# Altium PCB Kindle_TX.PcbDoc
Units mm, origin at the board's own origin, x right, y up, seen from the top; angles counter-clockwise.
Board outline 26 x 44 mm, 2 copper layers (Top Layer, Bottom Layer); 2 components, 2 nets, 20 pads, 0 vias.
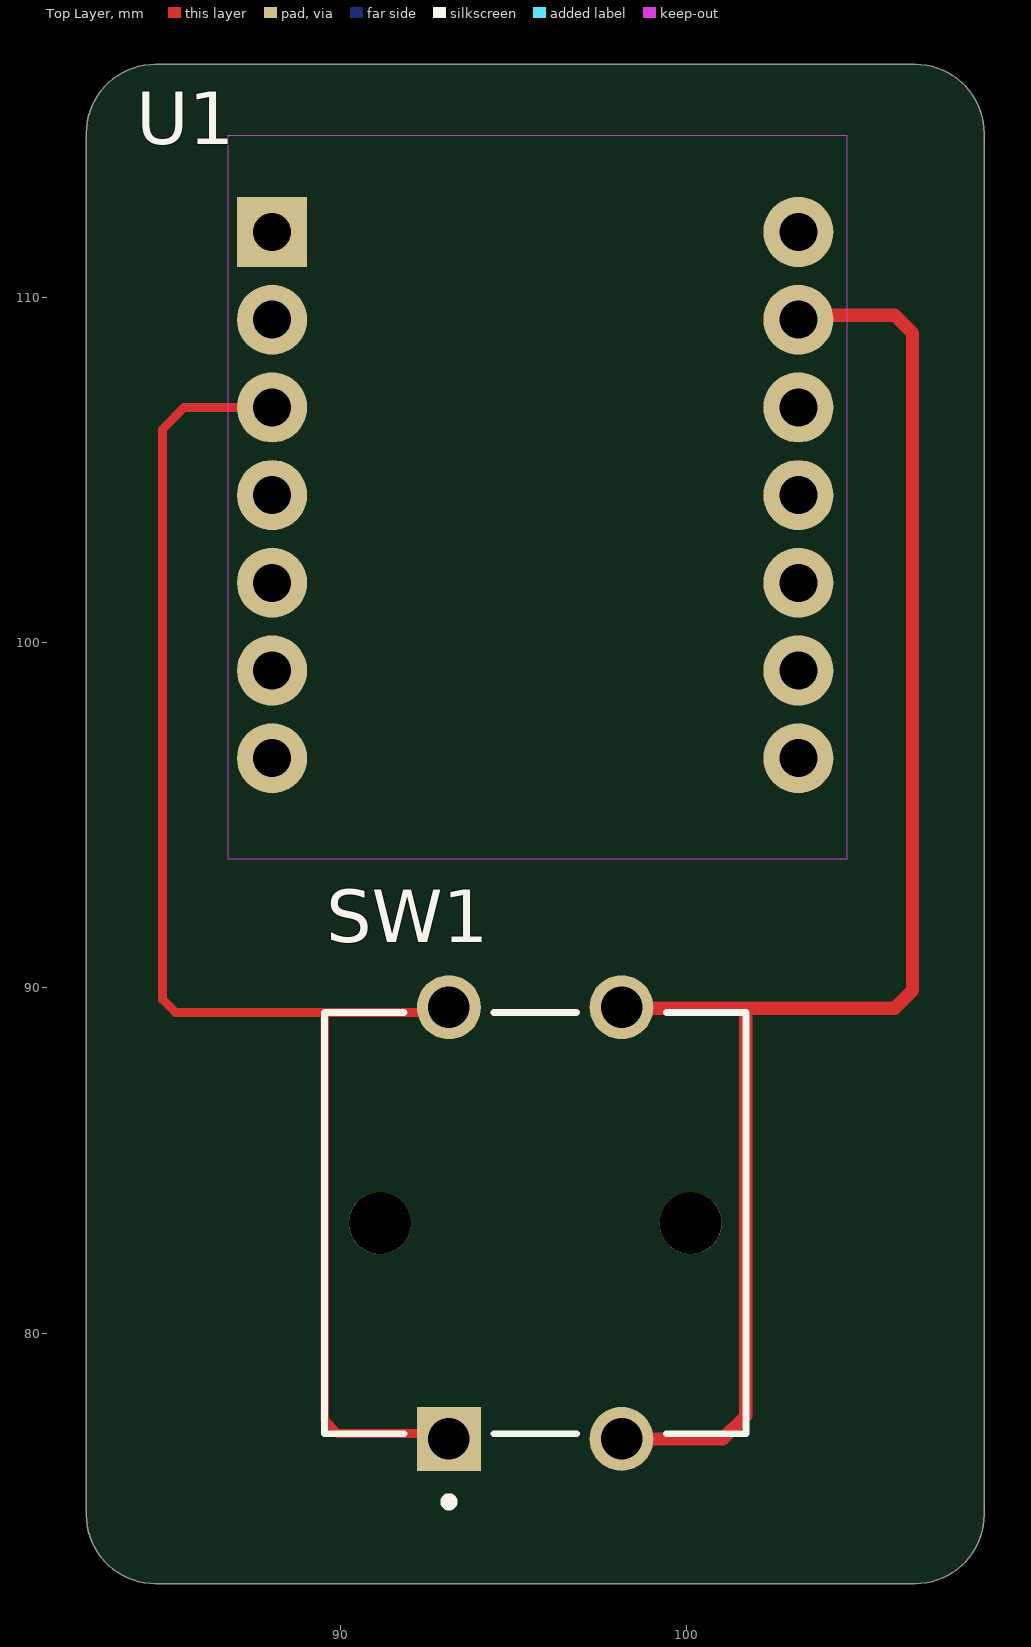
[diagram p0: Top Layer view]
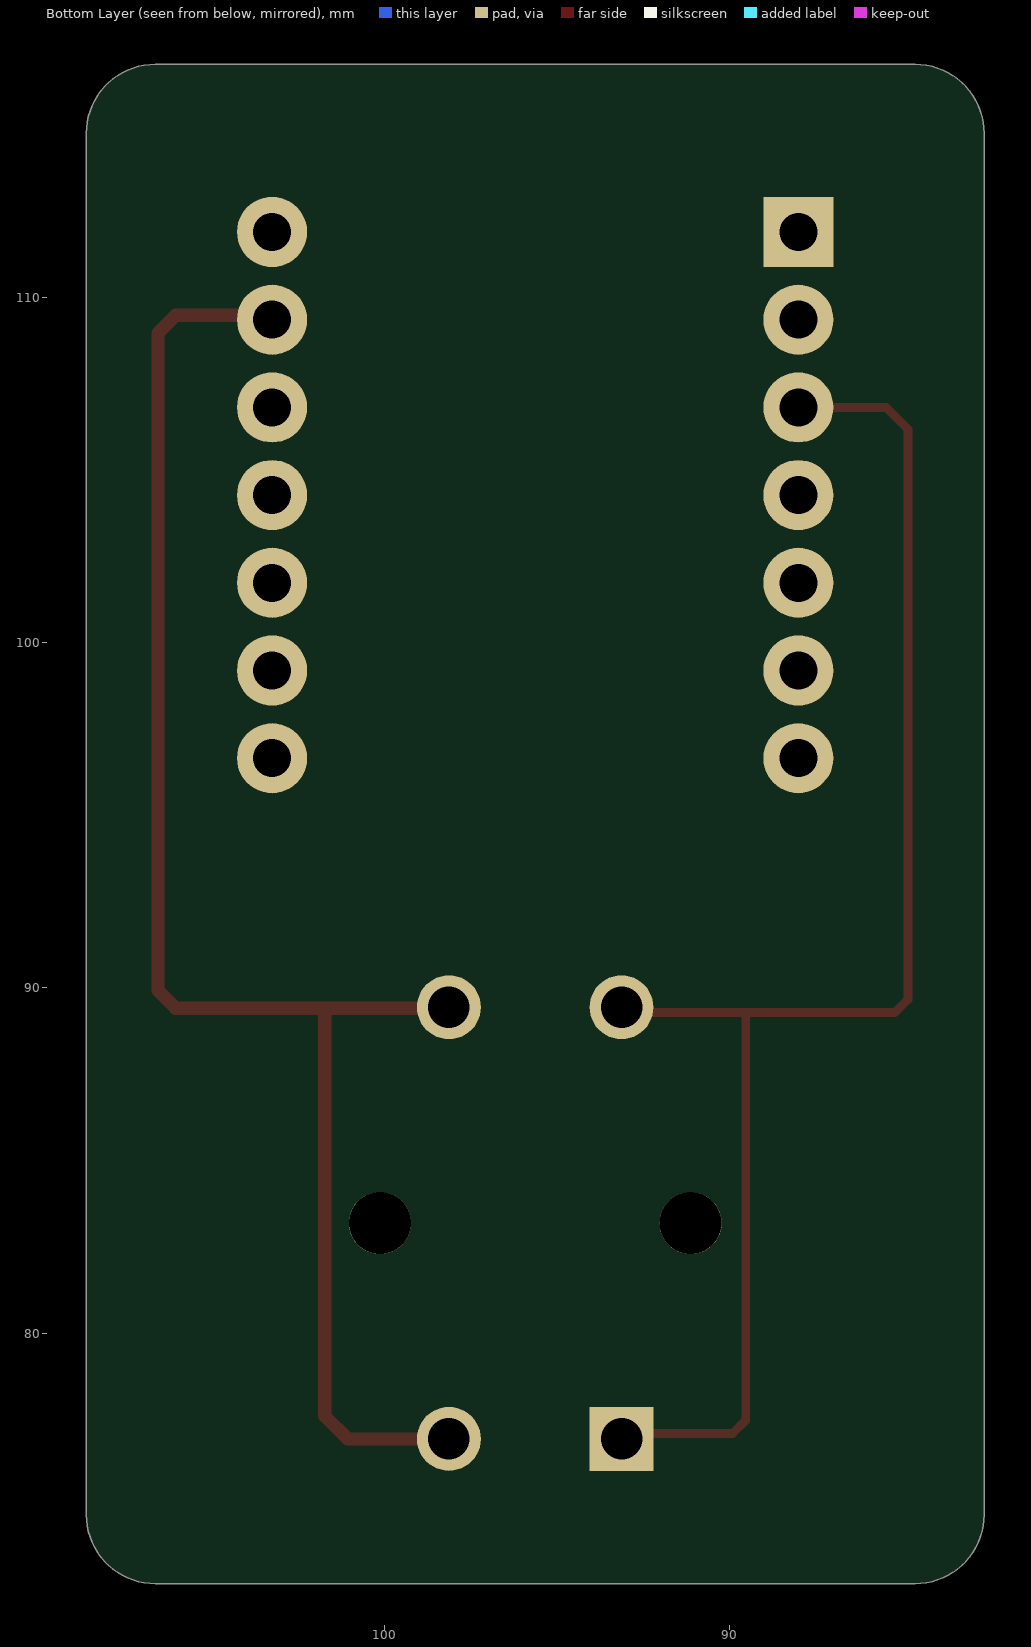
[diagram p1: Bottom Layer view, seen from below]

## Layer stack, top to bottom
Top Solder: solder mask 0.0102, Solder Resist, Dk 3.5
Top Layer: signal copper 0.0356
Dielectric 1: dielectric 0.32, FR-4, Dk 4.8
Bottom Layer: signal copper 0.0356
Bottom Solder: solder mask 0.0102, Solder Resist, Dk 3.5

## Board outline
82.631,74.742 82.631,114.742 cw(c84.631,114.742) 84.631,116.742 106.631,116.742 cw(c106.631,114.742) 108.631,114.742 108.631,74.742 cw(c106.631,74.742) 106.631,72.742 84.631,72.742 cw(c84.631,74.742)

## Design rules (kind name [scope] priority, off if disabled: settings)
Clearance [All] p1: gap=0.254 ignorepadtopadclearanceinfootprint=FALSE
PolygonConnect [All] p1: connectstyle=Relief reliefconductorwidth=0.254 reliefentries=4 polygonreliefangle="90 Angle" airgapwidth=0.254
RoutingVias [All] p1: holewidth=0.711 width=1.27 viastyle="Through Hole" minholewidth=0.711 minwidth=1.27 maxholewidth=0.711 maxwidth=1.27
SolderMaskExpansion [All] p1: expansion=0 istentingtop=FALSE
SupplyNets "Schematic Supply Nets" [InNet('GND')] p1: voltage=0.000
Width [All] p1: maxlimit=0.381 minlimit=0.254 preferedwidth=0.254
30 further rules are at their usual default settings.

## Classes and differential pairs
component class "TX Schematic": SW1

## Components (designator, comment, footprint, x,y, rotation, side; value= is the part's Value field where it differs from the comment)
SW1 "B3F-4000" FP-B3F-4000-MFG 95.631,83.185 r90 top
U1 "MOUDLE-SEEEDUINO-XIAO-ESP32C3-THRU-HOLE" MOUDLE14P-2-54-21X17-8MM 95.631,104.267 r90 top

## Footprints (in the part's own frame and the unit in brackets; to place one, negate y for a bottom-side part, rotate by r counter-clockwise, add the part's x,y. Pads: shape width x height; smd on the part's side, far side on the other; paste and mask are expansions set on the pad)
FP-B3F-4000-MFG [mm]
  rect 1.85x1.85 hole 1.2 paste-2539.97 mask+0: 1(-6.25,2.5)
  round 1.85 hole 1.2 paste-2539.97 mask+0: 2(6.25,2.5) 3(-6.25,-2.5) 4(6.25,-2.5)
  round 1.8 hole 1.8 unplated paste-2539.97 mask+0: ""(0,4.5) ""(0,-4.5)
  silkscreen extent -8.2,-6.1 6.1,6.1, body extent -7.27,-6.2 7.27,6.2, height 0.25
MOUDLE14P-2-54-21X17-8MM [mil]
  rect 80x80 hole 43.31: 1(300,300)
  round 80 hole 43.31: 2(200,300) 3(100,300) 4(0,300) 5(-100,300) 6(-200,300) 7(-300,300) 8(-300,-300) 9(-200,-300) 10(-100,-300) 11(0,-300) 12(100,-300) 13(200,-300) 14(300,-300)
  Top Layer keep-out region: -415,-355 -415,350 410,350 410,-355

## Part data
SW1: library part CMP-08834-000001-1, "SWITCH TACTILE SPST-NO 0.05A 24V", Ambient Temperature Range High=+70°C, Ambient Temperature Range Low=-25°C, Contact Current Rating=50mA, Contact Resistance=100mΩ, Manufacturer=Omron, Operating Force=1.27N, Temperature="-25°C to +70°C", Voltage Rating Dc=24V, Automotive=No, Category=Switch, ComponentLink2Description=Datasheet, ComponentLink2URL=https://omronfs.omron.com/en_US/ecb/products/pdf/en-b3f.pdf, Device Class L1=Electromechanical, Device Class L2=Switches, Device Class L3="Tactile Switches", Digikey Description="SWITCH TACTILE SPST-NO 0.05A 24V", Electromechanical Life=3000000Cycles, Height=4.5mm, Lead Free=Yes, Manufacturer Part Number=B3F-4000, Mount="Through Hole", Mouser Description="Tactile Switches 12x12mm Std Ht 4.3 Gen Purpose 130g", Octopart=https://octopart.com/b3f-4000-omron-22510, Package=B3F-4000, RoHS=TRUE, Temperature Range High=+70°C, Temperature Range Low=-25°C, Throw Configuration=SPST-NO
U1: library part MOUDLE-SEEEDUINO-XIAO-ESP32C3-SMD, Package=MOUDLE14P-SMD-2.54-21X17.8MM, DeviceName=-SMD, DeviceSetName=MOUDLE-SEEEDUINO-XIAO-ESP32C3, GateName_1=G$1, LibraryName=Seeed-Studio-XIAO-ESP32C3-footprint-eagle, SymbolName_1=MOUDLE-SEEEDUINO-XIAO-ESP32C3

## Nets (pads, with @x,y where several pads share a name; then routed paths per layer and width w, separated by ;. In a path a pad name is that pad's centre, name@x,y a point inside that pad or via, vN(x,y) a via of type N, cw(c..) or ccw(c..) an arc to the next point about the centre after c; other vN are vias at no path point)
GND: SW1.3 SW1.4 U1.13 | length 46.9
  Top Layer w0.381: SW1.3 101.065,76.935 101.727,77.597 101.727,89.408 ; SW1.4 98.158,89.408 101.727,89.408 ; U1.13 103.378,109.474 106.045,109.474 106.553,108.966 106.553,89.916 106.045,89.408 101.727,89.408
NetSW1_1: SW1.1 SW1.2 U1.3 | length 44.1
  Top Layer w0.254: U1.3 85.471,106.807 84.836,106.172 84.836,89.662 85.217,89.281 89.535,89.281 ; SW1.1 92.977,77.089 89.916,77.089 89.535,77.47 89.535,89.281 ; SW1.2 92.977,89.281 89.535,89.281
pads on no net: SW1. U1.1 U1.2 U1.4 U1.5 U1.6 U1.7 U1.8 U1.9 U1.10 U1.11 U1.12 U1.14

## Silkscreen, mask and mechanical layers (free items; w line width, h text height)
Mechanical 1:
  the board outline again, w0.254

## Text inside footprints (layer, text, board x,y; h text height)
U1: Top 3D Body "JP2" at 103.886,95.123 h1.38 r180; Top 3D Body "JP1" at 89.281,95.123 h1.38 r180